# Altium PCB BD1_yd_V1.0.PcbDoc (part 2 of 2)
Units mm, origin at the board's own origin, x right, y up, seen from the top; angles counter-clockwise.
Board outline 135.9 x 133.4 mm, 4 copper layers (Top Layer, Signal Layer 1, Signal Layer 2, Bottom Layer), stack 0.778 mm thick; 102 components, 201 nets, 640 pads, 101 vias.
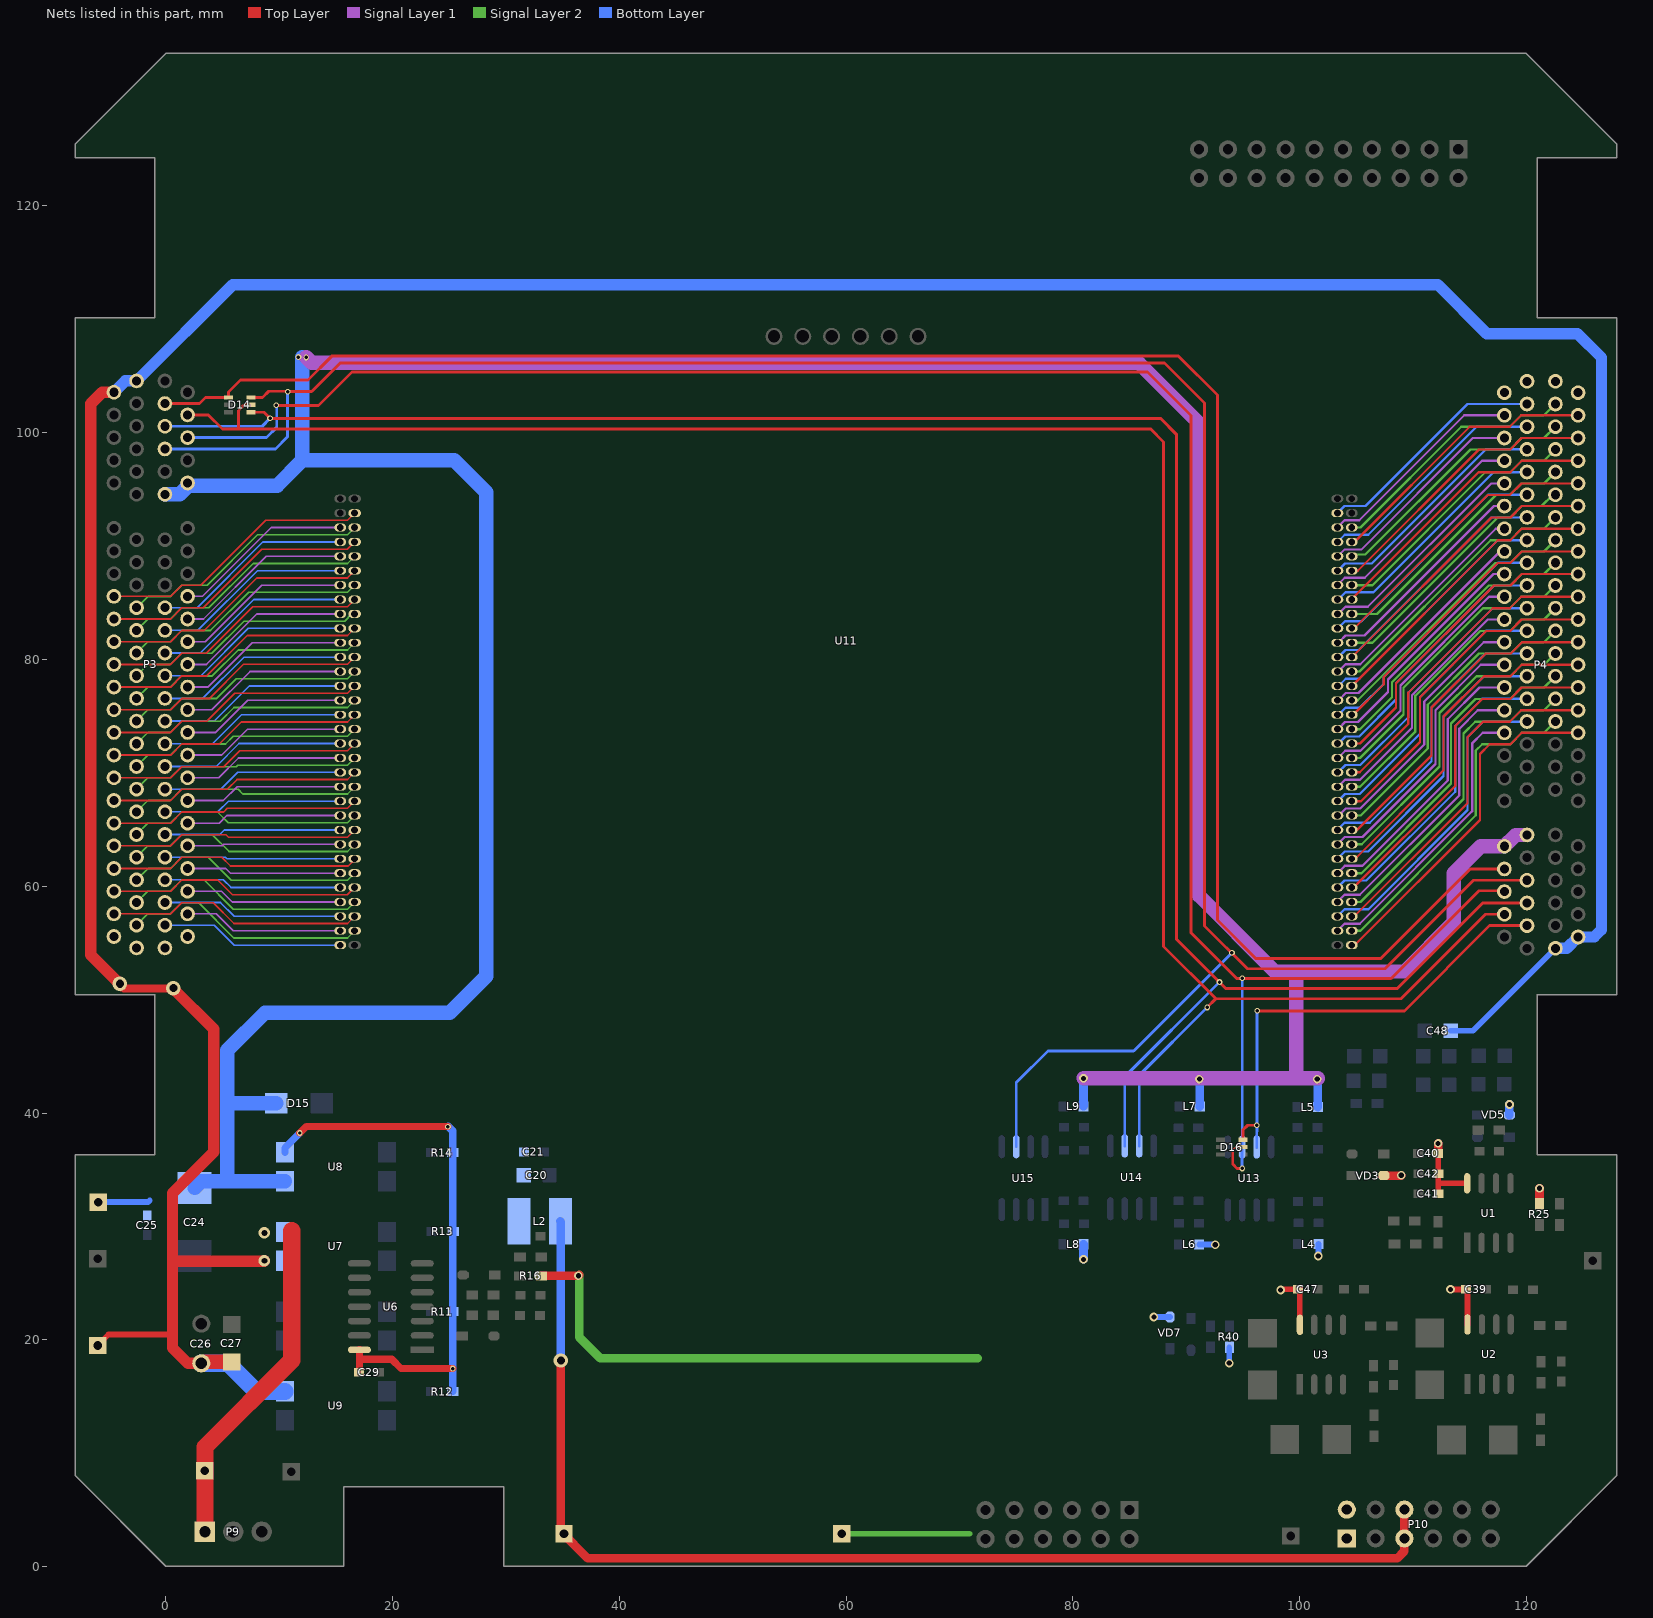
[diagram p4: the nets of this part, all layers, seen from the top]

## Via types
v1: diameter 0.762, hole 0.457, Top Layer to Bottom Layer, 48 vias
v2: diameter 0.508, hole 0.305, Top Layer to Bottom Layer, 40 vias
v3: diameter 1.27, hole 0.711, Top Layer to Bottom Layer, 11 vias
v4: diameter 1.016, hole 0.508, Top Layer to Bottom Layer, 2 vias

## Nets (pads, with @x,y where several pads share a name; then routed paths per layer and width w, separated by ;. In a path a pad name is that pad's centre, name@x,y a point inside that pad or via, vN(x,y) a via of type N, cw(c..) or ccw(c..) an arc to the next point about the centre after c; other vN are vias at no path point) (continued)
V+5V: C20.2 C21.1 C29.1 L2.2 R11.1 R12.1 R13.1 R14.1 U6.14 U8.4 | length 52.2
  Top Layer w0.635: v2(11.836,38.252) 12.421,38.837 24.867,38.837 v2(24.892,38.811) ; C29.1@17.066,17.147 17.091,17.172 17.091,18.29 ; U6.14@17.091,19.128 17.091,18.29 ; v2(25.321,17.477) 20.749,17.477 19.936,18.29 17.091,18.29
  Bottom Layer w0.635: U8.4@10.524,36.547 10.524,36.94 v2(11.836,38.252) ; v2(24.892,38.811) 25.326,38.377 ; v2@24.93,38.849 25.334,38.445 25.326,38.438 25.326,38.377 ; R12.1@25.326,15.445 25.326,38.377 ; R14.1@25.334,36.527 25.334,38.37 25.326,38.377
V_HV1: P9.1 pad.0@3.454,8.458 U7.4 | length 29.7
  Top Layer w1.524: P9.1@3.469,3.099 3.469,10.556 11.125,18.212 11.125,29.642
  other v4: 8.709,29.441
V_HV_C1: C26.1 C27.2 C48.1 P3.A1 P3.A2 P4.A1 P4.A2 pad.0@-5.994,19.507 U7.3 U9.4 | length 328.9
  Top Layer w0.508: pad.0@-5.994,19.507 -5.027,20.474 0.61,20.474
  Top Layer w0.7: v3@-3.886,51.232 -3.658,51.003 v3@0.66,51.003
  Top Layer w1: P3.A2@-4.562,103.575 -5.594,103.575 -6.604,102.565 -6.604,53.95 v3@-3.886,51.232 ; v3@0.66,51.003 4.242,47.422 4.242,36.576 0.61,32.944 0.61,26.949 ; C26.1@3.147,17.937 1.976,17.937 0.61,19.304 0.61,26.949 ; v4(8.709,26.977) 8.682,26.949 0.61,26.949
  Top Layer w1.27: C26.1@3.147,17.937 3.271,18.062 C27.2@5.839,18.062
  Bottom Layer w0.508: C48.1@113.335,47.269 115.291,47.269 P4.A1@122.559,54.537
  Bottom Layer w1: P3.A2@-4.562,103.575 -3.562,104.575 P3.A1@-2.562,104.575 5.914,113.051 112.197,113.051 116.51,108.737 124.511,108.737 126.619,106.629 126.619,56.185 125.971,55.537 P4.A2@124.559,55.537 123.559,54.537 P4.A1@122.559,54.537 P4.A1@122.641,54.455
  Bottom Layer w1.524: C26.1@3.147,17.937 5.506,17.937 7.984,15.459 U9.4@10.524,15.459
  other v3: 0.686,51.029 -4.039,51.41
VCC_3.3V: C39.1 C40.1 C41.1 C42.1 C47.1 L4.1 L6.1 L8.1 P10.1 P10.2 pad.0@59.614,2.921 R16.2 R25.2 R40.1 U1.8 U2.8 U3.8 VD3.2 VD5.2 VD7.2 | length 82.9
  Top Layer w0.508: v1(98.323,24.409) 98.391,24.477 C47.1@99.843,24.477 100.023,24.297 U3.8@100.023,21.334 ; C40.1@112.217,36.449 112.217,32.929 C41.1@112.238,32.908 ; 112.221,33.811 U1.8@114.78,33.811 ; v1(113.309,24.46) C39.1@114.681,24.46 114.808,24.333 U2.8@114.808,21.37
  Top Layer w0.762: R16.2@33.106,25.656 v1(36.4,25.656) v1@36.474,25.73 ; VD3.2@107.421,34.494 108.942,34.494 v1(108.966,34.519) ; C40.1@112.217,36.449 v1(112.217,37.338) ; R25.2@121.158,31.991 v1(121.158,33.376)
  Signal Layer 2 w0.508: pad.0@59.614,2.921 70.891,2.921
  Signal Layer 2 w0.762: v1@36.474,25.73 36.474,20.244 38.329,18.39 71.603,18.39
  Bottom Layer w0.508: v1(87.147,22.022) 87.15,22.025 VD7.2@88.57,22.025 ; L6.1@91.141,28.426 92.529,28.426 v1(92.558,28.397) ; v1@93.777,17.932 v1(93.802,17.958) R40.1@93.802,19.342 ; v1(101.651,27.407) 101.657,27.413 L4.1@101.657,28.451
  Bottom Layer w0.762: L8.1@80.941,28.441 80.941,27.111 v1(80.95,27.102) ; VD5.2@118.489,39.842 118.489,40.74 v1(118.516,40.767)
VCC_5V: L2.1 P10.5 P10.6 pad.0@35.128,2.921 | length 106.7
  Top Layer w0.762: v3(34.849,18.186) 34.849,3.124 37.236,0.737 108.61,0.737 109.24,1.366 P10.5@109.24,2.5 P10.6@109.24,5.04
  Bottom Layer w0.762: L2.1@34.817,30.457 34.849,30.425 v3(34.849,18.186)
VDD_C1: C24.1 C25.1 D15.2 L5.2 L7.2 L9.2 P3.B10 P3.B11 P4.B10 P4.B11 pad.0@-5.944,32.156 U8.3 | length 355
  Signal Layer 1 w1.27: v2(12.4,106.65) 12.882,106.167 85.801,106.167 91.084,100.884 91.084,59.233 97.82,52.497 99.695,52.497 ; v1@101.625,43.053 101.6,43.078 80.95,43.078 80.975,43.104 99.695,43.104 99.695,52.497 ; P4.B11@120.054,64.532 119.054,64.532 P4.B10@118.059,63.537 115.963,63.537 113.589,61.163 113.589,56.836 109.25,52.497 99.695,52.497
  Bottom Layer w0.508: pad.0@-5.944,32.156 -1.549,32.156 -1.397,32.309
  Bottom Layer w0.762: L9.2@80.941,40.604 v1(80.941,43.069) v1@80.975,43.104 ; v1(91.161,43.002) 91.192,42.971 L7.2@91.192,40.593 ; v1(101.549,43.002) 101.606,42.945 L5.2@101.606,40.542
  Bottom Layer w1.27: P3.B11@-0.057,94.58 1.235,94.58 1.997,95.342 9.827,95.342 12.05,97.565 ; C24.1@2.557,33.397 3.167,34.007 5.436,34.007 ; D15.2@9.76,40.869 5.563,40.869 5.436,40.742 ; U8.3@10.524,34.007 5.436,34.007 ; 12.05,106.65 12.05,97.565 ; 5.436,34.007 5.436,40.742 ; 5.436,40.742 5.436,45.542 8.763,48.87 25.07,48.87 28.27,52.07 28.27,94.742 25.447,97.565 12.05,97.565
  other v2: 11.714,106.675
ZL1_DIOB: D14.1 P3.B3 P4.B8 | length 172.5
  Top Layer w0.254: P3.B3@-0.062,102.575 2.982,102.575 3.52,103.114 D14.1@5.538,103.114 5.538,103.593 6.592,104.648 12.548,104.648 14.656,106.756 89.332,106.756 92.761,103.327 92.761,57.023 96.139,53.645 107.163,53.645 115.055,61.537 P4.B8@118.059,61.537
ZL1_HVO1: P3.A18 U11.4 | length 24.3
  Top Layer w0.152: P3.A18@-4.562,85.575 0.442,85.575 1.426,86.56 3.099,86.56 8.819,92.28 16.035,92.28 U11.4@16.67,92.915
ZL1_HVO2: P3.B18 U11.5 | length 16
  Signal Layer 1 w0.152: P3.B18@1.938,85.575 3.257,85.575 9.327,91.645 U11.5@15.4,91.645
ZL1_HVO3: P3.A19 U11.6 | length 22.2
  Signal Layer 2 w0.152: P3.A19@-2.562,84.575 -2.54,84.575 -1.545,85.569 0.436,85.569 1.426,86.56 3.658,86.56 8.108,91.01 16.035,91.01 U11.6@16.67,91.645
ZL1_HVO4: P3.B19 U11.7 | length 17.9
  Bottom Layer w0.152: P3.B19@-0.062,84.575 2.791,84.575 8.591,90.375 U11.7@15.4,90.375
ZL1_HVO5: P3.A20 U11.8 | length 24
  Top Layer w0.152: P3.A20@-4.562,83.575 0.442,83.575 1.426,84.56 3.309,84.56 8.487,89.738 16.033,89.738 U11.8@16.67,90.375
ZL1_HVO6: P3.B20 U11.9 | length 15.8
  Signal Layer 1 w0.152: P3.B20@1.938,83.575 3.34,83.575 8.87,89.105 U11.9@15.4,89.105
ZL1_HVO7: P3.A21 U11.10 | length 21.9
  Signal Layer 2 w0.152: P3.A21@-2.562,82.575 -1.568,83.569 0.414,83.569 1.404,84.56 3.817,84.56 7.727,88.47 16.035,88.47 U11.10@16.67,89.105
ZL1_HVO8: P3.B21 U11.11 | length 17.6
  Bottom Layer w0.152: P3.B21@-0.062,82.575 2.848,82.575 8.108,87.835 U11.11@15.4,87.835
ZL1_HVO9: P3.A22 U11.12 | length 23.8
  Top Layer w0.152: P3.A22@-4.562,81.575 0.442,81.575 1.426,82.56 3.392,82.56 8.03,87.198 16.033,87.198 U11.12@16.67,87.835
ZL1_HVO10: P3.B22 U11.13 | length 15.5
  Signal Layer 1 w0.152: P3.B22@1.938,81.575 3.499,81.575 8.489,86.565 U11.13@15.4,86.565
ZL1_HVO11: P3.A23 U11.14 | length 21.7
  Signal Layer 2 w0.152: P3.A23@-2.562,80.575 -1.568,81.569 0.414,81.569 1.404,82.56 3.951,82.56 7.321,85.93 16.035,85.93 U11.14@16.67,86.565
ZL1_HVO12: P3.B23 U11.15 | length 17.4
  Bottom Layer w0.152: P3.B23@-0.062,80.575 3.058,80.575 7.778,85.295 U11.15@15.4,85.295
ZL1_HVO13: P3.A24 U11.16 | length 23.6
  Top Layer w0.152: P3.A24@-4.562,79.575 0.442,79.575 1.426,80.56 3.576,80.56 7.676,84.66 16.035,84.66 U11.16@16.67,85.295
ZL1_HVO14: P3.B24 U11.17 | length 15.3
  Signal Layer 1 w0.152: P3.B24@1.938,79.575 3.607,79.575 8.057,84.025 U11.17@15.4,84.025
ZL1_HVO15: P3.A25 U11.18 | length 21.5
  Signal Layer 2 w0.152: P3.A25@-2.562,78.575 -1.568,79.569 0.414,79.569 1.404,80.56 4.084,80.56 6.914,83.39 15.794,83.39 16.429,84.025 U11.18@16.67,84.025
ZL1_HVO16: P3.B25 U11.19 | length 17.2
  Bottom Layer w0.152: P3.B25@-0.062,78.575 3.115,78.575 7.295,82.755 U11.19@15.4,82.755
ZL1_HVO17: P3.A26 U11.20 | length 23.4
  Top Layer w0.152: P3.A26@-4.562,77.575 0.442,77.575 1.426,78.56 3.634,78.56 7.194,82.12 16.035,82.12 U11.20@16.67,82.755
ZL1_HVO18: P3.B26 U11.21 | length 15.1
  Signal Layer 1 w0.152: P3.B26@1.938,77.575 3.716,77.575 7.625,81.485 U11.21@15.4,81.485
ZL1_HVO19: P3.A27 U11.22 | length 21.3
  Signal Layer 2 w0.152: P3.A27@-2.562,76.575 -1.568,77.569 0.414,77.569 1.404,78.56 4.116,78.56 6.406,80.85 16.035,80.85 U11.22@16.67,81.485
ZL1_HVO20: P3.B27 U11.23 | length 17
  Bottom Layer w0.152: P3.B27@-0.062,76.575 3.277,76.575 6.917,80.215 U11.23@15.4,80.215
ZL1_HVO21: P3.A28 U11.24 | length 23.2
  Top Layer w0.152: P3.A28@-4.562,75.575 0.442,75.575 1.426,76.56 3.847,76.56 6.867,79.58 16.035,79.58 U11.24@16.67,80.215
ZL1_HVO22: P3.B28 U11.25 | length 14.9
  Signal Layer 1 w0.152: P3.B28@1.938,75.575 4.078,75.575 7.448,78.945 U11.25@15.4,78.945
ZL1_HVO23: P3.A29 U11.26 | length 21
  Signal Layer 2 w0.152: P3.A29@-2.562,74.575 -1.568,75.569 0.414,75.569 1.404,76.56 4.478,76.56 6.228,78.31 16.035,78.31 U11.26@16.67,78.945
ZL1_HVO24: P3.B29 U11.27 | length 16.7
  Bottom Layer w0.152: P3.B29@-0.062,74.575 4.272,74.575 7.371,77.675 U11.27@15.4,77.675
ZL1_HVO25: P3.A30 U11.28 | length 22.9
  Top Layer w0.152: P3.A30@-4.562,73.575 0.442,73.575 1.426,74.56 3.625,74.56 6.105,77.04 16.035,77.04 U11.28@16.67,77.675
ZL1_HVO26: P3.B30 U11.29 | length 14.6
  Signal Layer 1 w0.152: P3.B30@1.938,73.575 4.418,73.575 7.248,76.405 U11.29@15.4,76.405
ZL1_HVO27: P3.A31 U11.30 | length 20.8
  Signal Layer 2 w0.152: P3.A31@-2.562,72.575 -1.568,73.569 0.414,73.569 1.404,74.56 4.815,74.56 6.025,75.77 16.035,75.77 U11.30@16.67,76.405
ZL1_HVO28: P3.B31 U11.31 | length 16.5
  Bottom Layer w0.152: P3.B31@-0.062,72.575 4.129,72.575 6.689,75.135 U11.31@15.4,75.135
ZL1_HVO29: P3.A32 U11.32 | length 22.7
  Top Layer w0.152: P3.A32@-4.562,71.575 0.442,71.575 1.426,72.56 4.72,72.56 6.66,74.5 16.035,74.5 U11.32@16.67,75.135
ZL1_HVO30: P3.B32 U11.33 | length 14.4
  Signal Layer 1 w0.152: P3.B32@1.938,71.575 4.933,71.575 7.223,73.865 U11.33@15.4,73.865
ZL1_HVO31: P3.A33 U11.34 | length 20.6
  Signal Layer 2 w0.152: P3.A33@-2.562,70.575 -1.568,71.569 0.414,71.569 1.404,72.56 5.279,72.56 5.949,73.23 16.035,73.23 U11.34@16.67,73.865
ZL1_HVO32: P3.B33 U11.35 | length 16.3
  Bottom Layer w0.152: P3.B33@-0.062,70.575 4.456,70.575 6.476,72.595 U11.35@15.4,72.595
ZL1_HVO33: P3.A34 U11.36 | length 22.5
  Top Layer w0.152: P3.A34@-4.562,69.575 0.442,69.575 1.426,70.56 5.137,70.56 6.537,71.96 16.035,71.96 U11.36@16.67,72.595
ZL1_HVO34: P3.B34 U11.37 | length 14.2
  Signal Layer 1 w0.152: P3.B34@1.938,69.575 4.682,69.575 6.432,71.325 U11.37@15.4,71.325
ZL1_HVO35: P3.A35 U11.38 | length 20.4
  Signal Layer 2 w0.152: P3.A35@-2.562,68.575 -1.568,69.569 0.414,69.569 1.404,70.56 6.225,70.56 6.355,70.69 16.035,70.69 U11.38@16.67,71.325
ZL1_HVO36: P3.B35 U11.39 | length 16.1
  Bottom Layer w0.152: P3.B35@-0.062,68.575 4.876,68.575 6.355,70.055 U11.39@15.4,70.055
ZL1_HVO37: P3.A36 U11.40 | length 22.3
  Top Layer w0.152: P3.A36@-4.562,67.575 0.442,67.575 1.426,68.56 5.445,68.56 6.305,69.42 16.035,69.42 U11.40@16.67,70.055
ZL1_HVO38: P3.B36 U11.41 | length 14
  Signal Layer 1 w0.152: P3.B36@1.938,67.575 5.095,67.575 6.305,68.785 U11.41@15.4,68.785
ZL1_HVO39: P3.A37 U11.42 | length 20.5
  Signal Layer 2 w0.152: P3.A37@-2.562,66.575 -1.568,67.569 0.414,67.569 1.404,68.56 6.399,68.56 6.809,68.15 16.035,68.15 U11.42@16.67,68.785
ZL1_HVO40: P3.B37 U11.43 | length 15.9
  Bottom Layer w0.152: P3.B37@-0.062,66.575 4.603,66.575 5.543,67.515 U11.43@15.4,67.515
ZL1_HVO41: P3.A38 U11.44 | length 22
  Top Layer w0.152: P3.A38@-4.562,65.575 0.442,65.575 1.426,66.56 5.115,66.56 5.435,66.88 16.035,66.88 U11.44@16.67,67.515
ZL1_HVO42: P3.B38 U11.45 | length 13.7
  Signal Layer 1 w0.152: P3.B38@1.938,65.575 4.72,65.575 5.39,66.245 U11.45@15.4,66.245
ZL1_HVO43: P3.A39 U11.46 | length 20.7
  Signal Layer 2 w0.152: P3.A39@-2.562,64.575 -1.568,65.569 0.414,65.569 1.404,66.56 4.57,66.56 5.52,65.61 16.035,65.61 U11.46@16.67,66.245
ZL1_HVO44: P3.B39 U11.47 | length 15.6
  Bottom Layer w0.152: P3.B39@-0.062,64.575 4.781,64.575 5.181,64.975 U11.47@15.4,64.975
ZL1_HVO45: P3.A40 U11.48 | length 22
  Top Layer w0.152: P3.A40@-4.562,63.575 0.442,63.575 1.426,64.56 5.325,64.56 5.545,64.34 16.035,64.34 U11.48@16.67,64.975
ZL1_HVO46: P3.B40 U11.49 | length 13.5
  Signal Layer 1 w0.152: P3.B40@1.938,63.575 5.001,63.575 5.13,63.705 U11.49@15.4,63.705
ZL1_HVO47: P3.A41 U11.50 | length 20.9
  Signal Layer 2 w0.152: P3.A41@-2.562,62.575 -1.568,63.569 0.414,63.569 1.404,64.56 4.106,64.56 5.596,63.07 16.035,63.07 U11.50@16.67,63.705
ZL1_HVO48: P3.B41 U11.51 | length 15.5
  Bottom Layer w0.152: P3.B41@-0.062,62.575 5.271,62.575 5.411,62.435 U11.51@15.4,62.435
ZL1_HVO49: P3.A42 U11.52 | length 22.3
  Top Layer w0.152: P3.A42@-4.562,61.575 0.442,61.575 1.426,62.56 4.963,62.56 5.723,61.8 16.106,61.8 16.67,62.364 U11.52@16.67,62.435
ZL1_HVO50: P3.B42 U11.53 | length 13.6
  Signal Layer 1 w0.152: P3.B42@1.938,61.575 5.313,61.575 5.723,61.165 U11.53@15.4,61.165
ZL1_HVO51: P3.A43 U11.54 | length 21.2
  Signal Layer 2 w0.152: P3.A43@-2.562,60.575 -1.568,61.569 0.414,61.569 1.404,62.56 3.744,62.56 5.774,60.53 16.035,60.53 U11.54@16.67,61.165
ZL1_HVO52: P3.B43 U11.55 | length 15.7
  Bottom Layer w0.152: P3.B43@-0.062,60.575 5.094,60.575 5.774,59.895 U11.55@15.4,59.895
ZL1_HVO53: P3.A44 U11.56 | length 22.4
  Top Layer w0.152: P3.A44@-4.562,59.575 0.442,59.575 1.426,60.56 4.601,60.56 5.901,59.26 16.005,59.26 16.64,59.895 U11.56@16.67,59.895
ZL1_HVO54: P3.B44 U11.57 | length 13.9
  Signal Layer 1 w0.152: P3.B44@1.938,59.575 4.926,59.575 5.876,58.625 U11.57@15.4,58.625
ZL1_HVO55: P3.A45 U11.58 | length 21.4
  Signal Layer 2 w0.152: P3.A45@-2.562,58.575 -1.568,59.569 0.414,59.569 1.404,60.56 3.407,60.56 5.977,57.99 16.035,57.99 U11.58@16.67,58.625
ZL1_HVO56: P3.B45 U11.59 | length 16
  Bottom Layer w0.152: P3.B45@-0.062,58.575 4.834,58.575 6.054,57.355 U11.59@15.4,57.355
ZL1_HVO57: P3.A46 U11.60 | length 22.7
  Top Layer w0.152: P3.A46@-4.562,57.575 0.442,57.575 1.426,58.56 4.188,58.56 6.028,56.72 16.035,56.72 U11.60@16.67,57.355
ZL1_HVO58: P3.B46 U11.61 | length 14.1
  Signal Layer 1 w0.152: P3.B46@1.938,57.575 4.481,57.575 5.971,56.085 U11.61@15.4,56.085
ZL1_HVO59: P3.A47 U11.62 | length 21.6
  Signal Layer 2 w0.152: P3.A47@-2.562,56.575 -1.568,57.569 0.414,57.569 1.404,58.56 2.911,58.56 6.021,55.45 16.035,55.45 U11.62@16.67,56.085
ZL1_HVO60: P3.B47 U11.63 | length 16.2
  Bottom Layer w0.152: P3.B47@-0.062,56.575 4.277,56.575 6.037,54.815 U11.63@15.4,54.815
ZL1_HVO61: P3.A48
ZL1_HVO62: P3.B48
ZL1_HVO63: P3.A49
ZL1_HVO64: P3.B49
ZL1_ZL2_BL: D14.5 P3.B4 P4.B4 U14.7 | length 185.3
  Top Layer w0.254: P3.B4@1.938,101.575 3.759,101.575 5.009,100.325 6.426,100.325 ; D14.5@7.518,102.464 6.934,102.464 6.426,101.956 6.426,100.325 ; v2(91.846,49.327) 92.608,50.089 92.619,50.089 ; P4.B4@118.059,57.537 116.389,57.537 108.941,50.089 92.619,50.089 ; 6.426,100.325 86.877,100.325 88.011,99.192 88.011,54.697 92.619,50.089
  Bottom Layer w0.254: U14.7@85.855,37.115 85.855,43.336 v2(91.846,49.327)
ZL1_ZL2_CLK: D16.5 P3.B6 P4.B6 U13.6 | length 192.4
  Top Layer w0.254: v2(9.749,102.418) 13.493,102.418 16.429,105.354 86.593,105.354 90.424,101.523 90.424,55.905 94.463,51.867 108.077,51.867 115.824,59.614 117.982,59.614 P4.B6@118.059,59.537 ; v2(94.945,35.128) 94.488,35.128 94.107,35.509 94.107,36.652 94.463,37.008 D16.5@94.995,37.008
  Bottom Layer w0.254: P3.B6@1.938,99.575 8.887,99.575 9.8,100.488 9.8,102.368 v2(9.749,102.418) ; v2(94.945,35.128) 94.92,35.154 94.92,37.017 U13.6@94.949,36.988 ; U13.6@94.945,36.458 v2(94.945,51.892)
ZL1_ZL2_DIOA: D16.6 P4.B3 U13.7 | length 41.8
  Top Layer w0.254: D16.6@94.995,37.658 94.995,38.506 95.428,38.938 v2(96.219,38.938) ; v2(96.266,49.022) 109.245,49.022 116.76,56.537 P4.B3@120.059,56.537
  Bottom Layer w0.254: U13.7@96.219,36.988 v2(96.219,38.938) ; 96.244,38.379 96.244,49 v2(96.266,49.022)
ZL1_ZL2_LE: D14.6 P3.B7 P4.B7 U15.6 | length 210.9
  Top Layer w0.254: D14.6@7.518,103.114 8.549,103.114 9.093,103.657 10.742,103.657 v2(10.772,103.627) 12.88,103.627 15.394,106.142 88.092,106.142 91.618,102.616 91.618,56.515 95.402,52.73 107.518,52.73 115.325,60.537 P4.B7@120.059,60.537
  Bottom Layer w0.254: P3.B7@-0.062,98.575 9.682,98.575 10.765,99.658 v2@10.765,103.627 ; U15.6@75.01,37.039 75.01,42.701 77.8,45.491 85.369,45.491 v2(94.031,54.153)
ZL1_ZL2_POL: D14.4 P3.B5 P4.B5 U14.6 | length 190.3
  Top Layer w0.254: D14.4@7.518,101.814 8.677,101.814 v2(9.216,101.275) 87.731,101.275 89.129,99.877 89.129,55.372 93.523,50.978 108.585,50.978 116.144,58.537 P4.B5@120.059,58.537
  Bottom Layer w0.254: P3.B5@-0.062,100.575 8.515,100.575 v2(9.216,101.275) ; U14.6@84.585,37.115 84.585,43.209 v2(92.939,51.562)
ZL2_HVO1: P4.A18 U11.127 | length 31.1
  Top Layer w0.2: U11.127@104.6,54.815 104.853,54.815 115.9,65.862 115.9,71.679 116.764,72.542 118.593,72.542 119.587,73.537 P4.A18@124.559,73.537
ZL2_HVO2: P4.B18 U11.126 | length 25.5
  Signal Layer 1 w0.2: U11.126@103.33,56.085 103.958,56.713 105.304,56.713 115.214,66.623 115.214,72.593 116.158,73.537 P4.B18@118.059,73.537
ZL2_HVO3: P4.A19 U11.125 | length 29
  Signal Layer 2 w0.2: U11.125@104.6,56.085 105.362,56.085 115.545,66.267 115.545,71.984 116.103,72.542 118.593,72.542 119.587,73.537 121.559,73.537 P4.A19@122.559,74.537
ZL2_HVO4: P4.B19 U11.124 | length 27.6
  Bottom Layer w0.2: U11.124@103.33,57.355 103.958,57.983 106.066,57.983 114.808,66.725 114.808,73.152 116.18,74.524 120.045,74.524 P4.B19@120.059,74.537
ZL2_HVO5: P4.A20 U11.123 | length 30.9
  Top Layer w0.2: U11.123@104.6,57.355 104.829,57.355 114.808,67.334 114.808,73.152 116.18,74.524 118.542,74.524 119.555,75.537 P4.A20@124.559,75.537
ZL2_HVO6: P4.B20 U11.122 | length 25.2
  Signal Layer 1 w0.2: U11.122@103.33,58.625 103.958,59.253 105.304,59.253 114.071,68.02 114.071,73.889 115.72,75.537 P4.B20@118.059,75.537
ZL2_HVO7: P4.A21 U11.121 | length 28.8
  Signal Layer 2 w0.2: U11.121@104.6,58.625 105.362,58.625 114.452,67.715 114.452,73.482 115.494,74.524 118.542,74.524 119.555,75.537 121.559,75.537 P4.A21@122.559,76.537
ZL2_HVO8: P4.B21 U11.120 | length 27
  Bottom Layer w0.2: U11.120@103.33,59.895 103.958,60.523 105.888,60.523 113.716,68.35 113.716,74.143 116.11,76.537 P4.B21@120.059,76.537
ZL2_HVO9: P4.A22 U11.119 | length 30.4
  Top Layer w0.2: U11.119@104.6,59.895 104.752,59.895 113.716,68.858 113.716,74.143 116.103,76.53 118.567,76.53 119.574,77.537 P4.A22@124.559,77.537
ZL2_HVO10: P4.B22 U11.118 | length 24.7
  Signal Layer 1 w0.2: U11.118@103.33,61.165 103.972,61.807 105.522,61.807 113.055,69.341 113.055,74.727 115.866,77.537 P4.B22@118.059,77.537
ZL2_HVO11: P4.A23 U11.117 | length 28.3
  Signal Layer 2 w0.2: U11.117@104.6,61.165 105.464,61.165 113.36,69.061 113.36,74.371 115.519,76.53 118.567,76.53 119.574,77.537 121.559,77.537 P4.A23@122.559,78.537
ZL2_HVO12: P4.B23 U11.116 | length 26.5
  Bottom Layer w0.2: U11.116@103.33,62.435 103.972,63.077 106.055,63.077 112.7,69.722 112.7,74.981 116.256,78.537 P4.B23@120.059,78.537
ZL2_HVO13: P4.A24 U11.115 | length 29.8
  Top Layer w0.2: U11.115@104.6,62.435 104.905,62.435 112.7,70.23 112.7,74.981 116.256,78.537 118.593,78.537 119.593,79.537 P4.A24@124.559,79.537
ZL2_HVO14: P4.B24 U11.114 | length 24.1
  Signal Layer 1 w0.2: U11.114@103.33,63.705 103.972,64.347 105.547,64.347 111.989,70.789 111.989,75.54 115.986,79.537 P4.B24@118.059,79.537
ZL2_HVO15: P4.A25 U11.113 | length 27.7
  Signal Layer 2 w0.2: U11.113@104.6,63.705 105.489,63.705 112.344,70.56 112.344,75.286 115.595,78.537 118.593,78.537 119.593,79.537 121.559,79.537 P4.A25@122.559,80.537
ZL2_HVO16: P4.B25 U11.112 | length 25.9
  Bottom Layer w0.2: U11.112@103.33,64.975 103.958,65.603 106.193,65.603 111.633,71.043 111.633,75.768 116.402,80.537 P4.B25@120.059,80.537
ZL2_HVO17: P4.A26 U11.111 | length 29.3
  Top Layer w0.2: U11.111@104.6,64.975 105.057,64.975 111.633,71.551 111.633,75.768 116.408,80.543 118.618,80.543 119.612,81.537 P4.A26@124.559,81.537
ZL2_HVO18: P4.B26 U11.110 | length 23.3
  Signal Layer 1 w0.2: U11.110@103.537,66.245 103.537,66.346 104.064,66.873 105.354,66.873 110.998,72.517 110.998,76.302 116.233,81.537 P4.B26@118.059,81.537
  Bottom Layer w0.2: U11.110@103.33,66.245 U11.110@103.537,66.245
ZL2_HVO19: P4.A27 U11.109 | length 27
  Signal Layer 2 w0.2: U11.109@104.6,66.245 105.386,66.245 111.303,72.161 111.303,76.022 115.824,80.543 118.618,80.543 119.612,81.537 121.559,81.537 P4.A27@122.559,82.537
ZL2_HVO20: P4.B27 U11.108 | length 24.8
  Bottom Layer w0.2: U11.108@103.33,67.515 103.386,67.515 104.013,68.143 105.303,68.143 110.617,73.457 110.617,76.683 116.471,82.537 P4.B27@120.059,82.537
ZL2_HVO21: P4.A28 U11.107 | length 28.9
  Top Layer w0.2: U11.107@104.6,67.515 105.412,67.515 110.617,72.72 110.617,76.683 116.459,82.525 118.567,82.525 119.58,83.537 P4.A28@124.559,83.537
ZL2_HVO22: P4.B28 U11.106 | length 22.6
  Signal Layer 1 w0.2: U11.106@103.537,68.785 103.537,68.936 104.013,69.413 105.328,69.413 109.906,73.99 109.906,76.86 116.582,83.537 P4.B28@118.059,83.537
  Bottom Layer w0.2: U11.106@103.33,68.785 U11.106@103.537,68.785
ZL2_HVO23: P4.A29 U11.105 | length 26.3
  Signal Layer 2 w0.2: U11.105@104.6,68.785 105.336,68.785 110.211,73.66 110.211,76.81 115.926,82.525 118.567,82.525 119.58,83.537 121.559,83.537 P4.A29@122.559,84.537
ZL2_HVO24: P4.B29 U11.104 | length 24
  Bottom Layer w0.2: U11.104@103.33,70.055 103.411,70.055 104.053,70.697 105.353,70.697 109.576,74.92 109.576,77.064 117.043,84.531 120.053,84.531 P4.B29@120.059,84.537
ZL2_HVO25: P4.A30 U11.103 | length 28
  Top Layer w0.2: U11.103@104.6,70.055 105.31,70.055 109.576,74.32 109.576,77.064 117.043,84.531 118.542,84.531 119.548,85.537 P4.A30@124.559,85.537
ZL2_HVO26: P4.B30 U11.102 | length 22
  Signal Layer 1 w0.2: U11.102@103.537,71.325 103.537,71.476 104.028,71.967 105.368,71.967 108.89,75.489 108.89,77.724 116.703,85.537 P4.B30@118.059,85.537
  Bottom Layer w0.2: U11.102@103.33,71.325 U11.102@103.537,71.325
ZL2_HVO27: P4.A31 U11.101 | length 25.1
  Signal Layer 2 w0.2: 105.181,71.325 105.336,71.325 109.169,75.159 109.169,77.521 116.18,84.531 118.542,84.531 119.548,85.537 121.559,85.537 P4.A31@122.559,86.537
ZL2_HVO28: P4.B31 U11.100 | length 23.3
  Bottom Layer w0.2: U11.100@103.33,72.595 103.411,72.595 104.039,73.223 105.252,73.223 108.509,76.479 108.509,77.902 117.144,86.537 P4.B31@120.059,86.537
ZL2_HVO29: P4.A32 U11.99 | length 27.4
  Top Layer w0.2: U11.99@104.6,72.595 105.336,72.595 108.509,75.768 108.509,77.902 117.145,86.538 118.593,86.538 119.592,87.537 P4.A32@124.559,87.537
ZL2_HVO30: P4.B32 U11.98 | length 21.1
  Signal Layer 1 w0.2: U11.98@103.537,73.865 103.537,74.016 104.013,74.493 105.151,74.493 107.798,77.14 107.798,78.232 117.103,87.537 P4.B32@118.059,87.537
  Bottom Layer w0.2: U11.98@103.33,73.865 U11.98@103.537,73.865
ZL2_HVO31: P4.A33 U11.97 | length 24.8
  Signal Layer 2 w0.2: U11.97@104.6,73.865 105.336,73.865 108.153,76.683 108.153,78.003 116.688,86.538 118.593,86.538 119.592,87.537 121.559,87.537 P4.A33@122.559,88.537
ZL2_HVO32: P4.B33 U11.96 | length 22.6
  Bottom Layer w0.2: U11.96@103.33,75.135 103.436,75.135 104.064,75.763 105.328,75.763 107.417,77.851 107.417,78.461 117.493,88.537 P4.B33@120.059,88.537
ZL2_HVO33: P4.A34 U11.95 | length 26.3
  Top Layer w0.2: U11.95@104.6,75.135 104.663,75.072 107.417,77.825 107.417,78.461 117.475,88.519 118.567,88.519 119.585,89.537 P4.A34@124.559,89.537
ZL2_HVO34: P4.B34 U11.94 | length 20.2
  Signal Layer 1 w0.2: U11.94@103.537,76.405 103.537,76.506 104.079,77.047 105.19,77.047 117.68,89.537 P4.B34@118.059,89.537
  Bottom Layer w0.2: U11.94@103.33,76.405 U11.94@103.537,76.405
ZL2_HVO35: P4.A35 U11.93 | length 23.8
  Signal Layer 2 w0.2: U11.93@104.6,76.405 105.132,76.405 117.246,88.519 118.567,88.519 119.585,89.537 121.559,89.537 P4.A35@122.559,90.537
ZL2_HVO36: P4.B35 U11.92 | length 22.1
  Bottom Layer w0.2: U11.92@103.33,77.675 103.436,77.675 104.064,78.303 105.252,78.303 117.475,90.526 120.047,90.526 P4.B35@120.059,90.537
ZL2_HVO37: P4.A36 U11.91 | length 25.7
  Top Layer w0.2: U11.91@104.6,77.675 104.624,77.675 117.475,90.526 118.567,90.526 119.579,91.537 P4.A36@124.559,91.537
ZL2_HVO38: P4.B36 U11.90 | length 20
  Signal Layer 1 w0.2: U11.90@103.537,78.945 103.537,79.071 104.053,79.587 105.343,79.587 117.293,91.537 P4.B36@118.059,91.537
  Bottom Layer w0.2: U11.90@103.33,78.945 U11.90@103.537,78.945
ZL2_HVO39: P4.A37 U11.89 | length 23.6
  Signal Layer 2 w0.2: U11.89@104.6,78.945 105.285,78.945 116.865,90.526 118.567,90.526 119.579,91.537 121.559,91.537 P4.A37@122.559,92.537
ZL2_HVO40: P4.B37 U11.88 | length 21.8
  Bottom Layer w0.2: U11.88@103.33,80.215 103.411,80.215 104.039,80.843 105.228,80.843 116.922,92.537 P4.B37@120.059,92.537
ZL2_HVO41: P4.A38 U11.87 | length 25.5
  Top Layer w0.2: U11.87@104.6,80.215 116.917,92.532 118.593,92.532 119.597,93.537 P4.A38@124.559,93.537
ZL2_HVO42: P4.B38 U11.86 | length 19.8
  Signal Layer 1 w0.2: U11.86@103.537,81.485 103.537,81.611 104.053,82.127 105.724,82.127 117.134,93.537 P4.B38@118.059,93.537
  Bottom Layer w0.2: U11.86@103.33,81.485 U11.86@103.537,81.485
ZL2_HVO43: P4.A39 U11.85 | length 23.4
  Signal Layer 2 w0.2: U11.85@104.6,81.485 106.429,81.485 117.476,92.532 118.593,92.532 119.597,93.537 121.336,93.537 122.336,94.537 P4.A39@122.559,94.537
ZL2_HVO44: P4.B39 U11.84 | length 21.6
  Bottom Layer w0.2: U11.84@103.33,82.755 103.386,82.755 104.013,83.383 105.455,83.383 116.61,94.537 P4.B39@120.059,94.537
ZL2_HVO45: P4.A40 U11.83 | length 25.3
  Top Layer w0.2: U11.83@104.6,82.755 104.828,82.755 116.586,94.513 118.542,94.513 119.565,95.537 P4.A40@124.559,95.537
ZL2_HVO46: P4.B40 U11.82 | length 19.6
  Signal Layer 1 w0.2: U11.82@103.537,84.025 103.537,84.151 104.039,84.653 106.014,84.653 116.898,95.537 P4.B40@118.059,95.537
  Bottom Layer w0.2: U11.82@103.33,84.025 U11.82@103.537,84.025
ZL2_HVO47: P4.A41 U11.81 | length 23.1
  Signal Layer 2 w0.2: U11.81@104.6,84.025 106.834,84.025 117.323,94.513 118.542,94.513 119.565,95.537 121.557,95.537 P4.A41@122.559,96.537 P4.A41@122.559,96.537
ZL2_HVO48: P4.B41 U11.80 | length 21.4
  Bottom Layer w0.2: U11.80@103.33,85.295 103.411,85.295 104.053,85.937 106.511,85.937 117.094,96.52 120.042,96.52 P4.B41@120.059,96.537
ZL2_HVO49: P4.A42 U11.79 | length 25.1
  Top Layer w0.2: U11.79@104.6,85.295 104.6,85.347 115.773,96.52 118.567,96.52 119.584,97.537 P4.A42@124.559,97.537
ZL2_HVO50: P4.B42 U11.78 | length 19.3
  Signal Layer 1 w0.2: U11.78@103.33,86.565 103.972,87.207 105.749,87.207 116.079,97.537 P4.B42@118.059,97.537
ZL2_HVO51: P4.A43 U11.77 | length 22.9
  Signal Layer 2 w0.2: U11.77@104.6,86.565 106.428,86.565 116.383,96.52 118.567,96.52 119.584,97.537 121.559,97.537 P4.A43@122.559,98.537
ZL2_HVO52: P4.B43 U11.76 | length 21.2
  Bottom Layer w0.2: U11.76@103.33,87.835 103.386,87.835 104.013,88.463 106.37,88.463 116.444,98.537 P4.B43@120.059,98.537
ZL2_HVO53: P4.A44 U11.75 | length 24.8
  Top Layer w0.2: U11.75@104.6,87.835 105.132,87.835 115.824,98.527 118.567,98.527 119.578,99.537 P4.A44@124.559,99.537
ZL2_HVO54: P4.B44 U11.74 | length 19.2
  Signal Layer 1 w0.178: U11.74@103.553,89.105 103.553,89.298 103.977,89.722 105.47,89.722 115.285,99.537 P4.B44@118.059,99.537
  Bottom Layer w0.178: U11.74@103.33,89.105 U11.74@103.553,89.105
ZL2_HVO55: P4.A45 U11.73 | length 22.7
  Signal Layer 2 w0.2: U11.73@104.6,89.105 104.752,89.257 105.793,89.257 115.062,98.527 118.567,98.527 119.578,99.537 121.559,99.537 P4.A45@122.559,100.537
ZL2_HVO56: P4.B45 U11.72 | length 20.9
  Bottom Layer w0.2: U11.72@103.33,90.375 103.36,90.375 103.988,91.003 106.065,91.003 115.599,100.537 P4.B45@120.059,100.537
ZL2_HVO57: P4.A46 U11.71 | length 24.6
  Top Layer w0.2: U11.71@104.6,90.375 104.853,90.375 115.011,100.533 118.542,100.533 119.546,101.537 P4.A46@124.559,101.537
ZL2_HVO58: P4.B46 U11.70 | length 18.8
  Signal Layer 1 w0.2: U11.70@103.33,91.645 103.964,92.279 105.258,92.279 114.516,101.537 P4.B46@118.059,101.537
ZL2_HVO59: P4.A47 U11.69 | length 22.5
  Signal Layer 2 w0.2: U11.69@104.6,91.645 105.361,91.645 114.249,100.533 118.542,100.533 119.546,101.537 121.559,101.537 P4.A47@122.559,102.537
ZL2_HVO60: P4.B47 U11.68 | length 20.7
  Bottom Layer w0.2: U11.68@103.33,92.915 103.335,92.915 103.963,93.543 105.811,93.543 114.805,102.537 P4.B47@120.059,102.537
ZL2_HVO61: P4.A48
ZL2_HVO62: P4.B48
ZL2_HVO63: P4.A49
ZL2_HVO64: P4.B49
pads on no net: D14.3 D16.1 D16.3 D16.4 P3.A3 P3.A4 P3.A5 P3.A6 P3.A7 P3.A8 P3.A9 P3.A10 P3.A11 P3.A12 P3.A13 P3.A14 P3.A15 P3.A16 P3.A17 P3.B8 P3.B9 P3.B12 P3.B13 P3.B14 P3.B15 P3.B16 P3.B17 P4.A3 P4.A4 P4.A5 P4.A6 P4.A7 P4.A8 P4.A9 P4.A10 P4.A11 P4.A12 P4.A13 P4.A14 P4.A15 P4.A16 P4.A17 P4.B9 P4.B12 P4.B13 P4.B14 P4.B15 P4.B16 P4.B17 P9.2 P10.11 P10.12 P21.2 P21.9 P21.11 P30.1 P30.2 U15.2 U15.7

## Polygon pours and split planes (outlines as drawn)
GND on Signal Layer 1 "Top Layer-No Net" (solid, remove dead copper, pour order 13): 7.188,1.295 7.188,9.906 9.296,12.014 13.335,16.053 13.335,20.066 13.335,22.682 14.326,23.673 15.392,24.74 15.392,36.932 17.297,38.837 17.323,38.837 40.157,38.837 41.859,37.135 41.885,37.109 41.885,24.997 41.885,24.333 44.552,21.666 44.577,21.641 71.806,21.641 71.821,21.641 72.288,22.109 72.288,32.754 72.288,33.02 72.796,33.528 103.353,33.528 103.861,34.036 103.861,44.043 103.861,44.044 106.07,46.253 106.096,46.228 119.507,46.228 119.572,46.228 120.04,45.759 120.04,35.408 120.65,34.798 120.675,34.773 124.993,34.773 125.096,34.773 125.578,34.291 125.578,8.077 118.73,1.23
GND_C1 on Signal Layer 1 "Top Layer-No Net" (solid, remove dead copper, pour order 5): 73.127,34.747 73.177,34.696 103.048,34.696 103.048,44.094 103.149,44.196 102.895,43.942 73.127,43.942
VCC_3.3V on Signal Layer 2 "Top Layer-No Net" (solid, remove dead copper, pour order 9): 118.73,1.23 125.578,8.077 125.578,34.752 120.061,34.752 120.04,34.773 120.04,46.253 106.07,46.253 103.861,44.044 103.861,34.036 103.353,33.528 72.314,33.528 72.288,33.503 72.288,21.641 72.288,21.59 70.942,20.244 69.621,18.923 69.621,1.245

## Keep-outs
Keep-Out Layer:
  circle w0.1: c23.5,62 r1.65
  circle w0.1: c23.5,87 r1.65
  circle w0.1: c60,103.295 r1.35
  circle w0.1: c96.5,62 r1.65
  circle w0.1: c96.5,87 r1.65
  circle w0.1: c23.5,61.988 r1.65
  circle w0.1: c23.5,87.007 r1.65
  circle w0.1: c60,103.289 r1.35
  circle w0.1: c96.5,61.988 r1.65
  circle w0.1: c96.5,87.007 r1.65
  lines w0.1: -8,53.395 -8,107.195 ; -8,77.147 -8,50.4 -1,50.4 -1,36.4 -8,36.4 -8,8 ; -8,81.947 -8,110.2 -1,110.2 -1,124.2 -8,124.2 -8,125.5 ; 15.494,0 15.316,0 15.316,7.493 30.15,7.493 30.15,0 ; 128,53.395 128,107.195 ; 128,77.147 128,50.4 121,50.4 121,36.4 128,36.4 128,8 ; 128,81.947 128,110.2 121,110.2 121,124.2 128,124.2 128,125.5 ; -8,8 0,0 ; -8,8 0,0 ; -8,125.5 0,133.5 ; -8,125.5 0,133.5 ; 0,0 15.773,0 15.773,7 29.773,7 29.773,0 120,0 ; 0,133.5 120,133.5 ; 0,133.5 120,133.5 ; 35,49.495 49,49.495 ; 35,49.495 35,99.495 ; 35,49.495 49,49.495 ; 35,49.495 35,99.495 ; 35,99.495 85,99.495 ; 35,99.495 85,99.495 ; 49,22.895 49,49.495 ; 49,22.895 71,22.895 ; 49,22.895 49,49.495 ; 49,22.895 71,22.895 ; 71,22.895 71,49.495 ; 71,22.895 71,49.495 ; 71,49.495 85,49.495 ; 71,49.495 85,49.495 ; 85,49.495 85,99.495 ; 85,49.495 85,99.495 ; 120,0 128,8 ; 120,0 128,8 ; 120,133.5 128,125.5 ; 120,133.5 128,125.5

## Other copper
Top Layer:
  rectangle net V_HV1: 8.151,28.679 11.405,30.406
  rectangle net VCC_3.3V: 103.124,1.523 105.163,6.147
  rectangle net GND: 105.689,1.524 107.569,6.096
  rectangle net GND: 110.846,1.448 115.24,6.147
Signal Layer 1:
  rectangle net VDD_C1: 11.333,106.116 12.4,107.285
Signal Layer 2:
  rectangle net V_HV_C1: -4.013,50.724 0.711,51.359
Bottom Layer:
  rectangle net V_HV_C1: -4.013,50.698 0.711,51.359
  rectangle net VDD_C1: 11.333,106.294 12.781,107.285
  rectangle net VDD_C1: 4.403,37.674 6.918,39.503
  rectangle net V_HV_C1: 8.125,26.24 11.275,27.587
  rectangle net GND_C1: -2.009,26.444 2.664,28.755
  rectangle net GND_C1: -2.009,26.444 -0.816,29.669
  rectangle net VDD_C1: -2.06,32.616 2.766,34.622
  rectangle net VDD_C1: -2.06,30.533 -0.866,34.622
  rectangle net GND_C1: 2.08,20.602 4.391,28.755
  rectangle net V_HV1: 8.151,28.679 11.275,30.355
  rectangle net V+5V: 30.376,30.66 32.052,37.112
  rectangle net V+5V: 25.067,33.352 31.112,35.638
  rectangle net VCC_3.3V: 103.124,1.523 105.163,6.147
  rectangle net GND: 105.689,1.524 107.569,6.096
  rectangle net GND: 110.846,1.448 115.24,6.147

## Silkscreen, mask and mechanical layers (free items; w line width, h text height)
Top Overlay:
  drawing of 1105 lines, arcs and shapes, not listed
  text "DROP CONTROL BDNO1 V1.0" at 36.322,129.692 h1.8
  text "VDD_C1" at -4.445,31.318 h1.8
  text "S1" at 124.917,28.219 h1.5
  text "GND_C1" at -4.496,26.391 h1.8
  text "V_HV_C1" at -7.493,20.955 h1.5
  text "HV1" at 1.219,9.703 h1.8
  text "GND" at 9.042,9.601 h1.8
  text "+5V" at 32.944,4.343 h1.8
  text "3.3V" at 56.464,4.14 h1.8
  text "S2" at 98.196,4.089 h1.5
Bottom Overlay:
  lines w0.1: 81.94,29.845 82.144,29.845 83.693,28.296 ; 91.948,29.947 92.38,29.947 94.031,28.296 ; 106.655,48.87 108.534,48.87 ; 107.848,48.87 107.848,48.082 109.982,45.949
Mechanical 1:
  circle w0.1: c23.5,62 r1.65
  circle w0.1: c23.5,87 r1.65
  circle w0.1: c60,103.295 r1.35
  circle w0.1: c96.5,62 r1.65
  circle w0.1: c96.5,87 r1.65
  circle w0.1: c23.5,61.988 r1.65
  circle w0.1: c23.5,87.007 r1.65
  circle w0.1: c60,103.289 r1.35
  circle w0.1: c96.5,61.988 r1.65
  circle w0.1: c96.5,87.007 r1.65
  lines w0.1: -8,53.395 -8,107.195 ; -8,77.147 -8,50.4 -1,50.4 -1,36.4 -8,36.4 -8,8 ; -8,81.947 -8,110.2 -1,110.2 -1,124.2 -8,124.2 -8,125.5 ; 128,53.395 128,107.195 ; 128,77.147 128,50.4 121,50.4 121,36.4 128,36.4 128,8 ; 128,81.947 128,110.2 121,110.2 121,124.2 128,124.2 128,125.5 ; -8,8 0,0 ; -8,8 0,0 ; -8,125.5 0,133.5 ; -8,125.5 0,133.5 ; 0,0 15.773,0 15.773,7 29.773,7 29.773,0 120,0 ; 0,133.5 120,133.5 ; 0,133.5 120,133.5 ; 35,49.495 35,99.495 ; 35,49.495 49,49.495 ; 35,49.495 35,99.495 ; 35,49.495 49,49.495 ; 35,99.495 85,99.495 ; 35,99.495 85,99.495 ; 49,22.895 71,22.895 ; 49,22.895 49,49.495 ; 49,22.895 71,22.895 ; 49,22.895 49,49.495 ; 71,22.895 71,49.495 ; 71,22.895 71,49.495 ; 71,49.495 85,49.495 ; 71,49.495 85,49.495 ; 85,49.495 85,99.495 ; 85,49.495 85,99.495 ; 120,0 128,8 ; 120,0 128,8 ; 120,133.5 128,125.5 ; 120,133.5 128,125.5
Mechanical 15:
  lines w0.1: 60,-13.828 60,123.418

## Text inside footprints (layer, text, board x,y; h text height)
P3: Bottom Overlay "A" at -1.812,107.075 h2.03 r90; Bottom Overlay "B" at 0.738,107.074 h2.03 r90
P4: Bottom Overlay "B" at 119.259,52.038 h2.03 r270; Bottom Overlay "A" at 121.809,52.037 h2.03 r270
P10: Top Overlay "12" at 118.511,4.532 h1.6; Top Overlay "11" at 118.511,1.992 h1.6; Top Overlay "1" at 101.62,1.992 h1.6; Top Overlay "2" at 101.62,4.532 h1.6
P21: Top Overlay "12" at 70.649,2.968 h1.6 r180; Top Overlay "11" at 70.649,5.508 h1.6 r180; Top Overlay "1" at 87.54,5.508 h1.6 r180; Top Overlay "2" at 87.54,2.968 h1.6 r180
P30: Top Overlay "2" at 116.54,122.968 h1.6 r180; Top Overlay "1" at 116.54,125.508 h1.6 r180; Top Overlay "16" at 94.188,122.714 h1.02 r180; Top Overlay "15" at 94.188,125.762 h1.02 r180; Top Overlay "19" at 89.489,125.508 h1.6 r180; Top Overlay "20" at 89.362,122.968 h1.6 r180
U11: Top Overlay "HV7" at 19.719,88.842 h0.76; Top Overlay "HV6" at 17.814,88.842 h0.76; Top Overlay "HV5" at 19.719,90.112 h0.76; Top Overlay "HV4" at 17.814,90.112 h0.76; Top Overlay "HV3" at 19.719,91.382 h0.76; Top Overlay "HV2" at 17.814,91.382 h0.76; Top Overlay "HEAT1" at 19.211,93.916 h0.76; Top Overlay "GND" at 17.92,93.922 h0.76; Top Overlay "HEAT2" at 17.814,92.646 h0.76; Top Overlay "HV1" at 19.973,92.652 h0.76; Top Overlay "HV9" at 19.719,87.572 h0.76; Top Overlay "HV11" at 19.719,86.302 h0.76; Top Overlay "HV13" at 19.719,85.032 h0.76; Top Overlay "HV15" at 19.719,83.762 h0.76; Top Overlay "HV17" at 19.719,82.492 h0.76; Top Overlay "HV19" at 19.719,81.222 h0.76; Top Overlay "HV21" at 19.719,79.952 h0.76; Top Overlay "HV23" at 19.719,78.682 h0.76; Top Overlay "HV25" at 19.719,77.412 h0.76; Top Overlay "HV27" at 19.719,76.142 h0.76; Top Overlay "HV29" at 19.719,74.872 h0.76; Top Overlay "HV31" at 19.719,73.602 h0.76; Top Overlay "HV33" at 19.719,72.332 h0.76; Top Overlay "HV35" at 19.719,71.062 h0.76; Top Overlay "HV37" at 19.719,69.792 h0.76; Top Overlay "HV39" at 19.719,68.522 h0.76; Top Overlay "HV41" at 19.719,67.252 h0.76; Top Overlay "HV43" at 19.719,65.982 h0.76; Top Overlay "HV45" at 19.719,64.712 h0.76; Top Overlay "HV47" at 19.719,63.442 h0.76; Top Overlay "HV49" at 19.719,62.172 h0.76; Top Overlay "HV51" at 19.719,60.902 h0.76; Top Overlay "HV53" at 19.719,59.632 h0.76; Top Overlay "HV55" at 19.719,58.362 h0.76; Top Overlay "HV57" at 19.719,57.092 h0.76; Top Overlay "HV59" at 19.719,55.822 h0.76; Top Overlay "HV8" at 17.814,87.572 h0.76; Top Overlay "HV10" at 17.814,86.302 h0.76; Top Overlay "HV12" at 17.814,85.032 h0.76; Top Overlay "HV14" at 17.814,83.762 h0.76; Top Overlay "HV16" at 17.814,82.492 h0.76; Top Overlay "HV18" at 17.814,81.222 h0.76; Top Overlay "HV20" at 17.814,79.952 h0.76; Top Overlay "HV22" at 17.814,78.682 h0.76; Top Overlay "HV24" at 17.814,77.412 h0.76; Top Overlay "HV26" at 17.814,76.142 h0.76; Top Overlay "HV28" at 17.814,74.872 h0.76; Top Overlay "HV30" at 17.814,73.602 h0.76; Top Overlay "HV32" at 17.814,72.332 h0.76; Top Overlay "HV34" at 17.814,71.062 h0.76; Top Overlay "HV36" at 17.814,69.792 h0.76; Top Overlay "HV38" at 17.814,68.522 h0.76; Top Overlay "HV40" at 17.814,67.252 h0.76; Top Overlay "HV42" at 17.814,65.982 h0.76; Top Overlay "HV44" at 17.814,64.712 h0.76; Top Overlay "HV46" at 17.814,63.442 h0.76; Top Overlay "HV48" at 17.814,62.172 h0.76; Top Overlay "HV50" at 17.814,60.902 h0.76; Top Overlay "HV52" at 17.814,59.632 h0.76; Top Overlay "HV54" at 17.814,58.362 h0.76; Top Overlay "HV56" at 17.814,57.092 h0.76; Top Overlay "HV58" at 17.814,55.822 h0.76; Top Overlay "HV60" at 17.814,54.552 h0.76; Top Overlay "GND" at 19.698,54.552 h0.76; Top Overlay "HV54" at 98.967,88.842 h0.76; Top Overlay "HV55" at 100.999,88.842 h0.76; Top Overlay "HV56" at 98.967,90.112 h0.76; Top Overlay "HV57" at 100.999,90.112 h0.76; Top Overlay "HV58" at 98.967,91.382 h0.76; Top Overlay "HV59" at 100.999,91.382 h0.76; Top Overlay "GND" at 101.252,93.804 h0.76; Top Overlay "HEAT3" at 98.966,93.804 h0.76; Top Overlay "HV60" at 98.839,92.534 h0.76; Top Overlay "HEAT4" at 100.617,92.534 h0.76; Top Overlay "HV52" at 98.967,87.572 h0.76; Top Overlay "HV50" at 98.967,86.302 h0.76; Top Overlay "HV48" at 98.967,85.032 h0.76; Top Overlay "HV46" at 98.967,83.762 h0.76; Top Overlay "HV44" at 98.967,82.492 h0.76; Top Overlay "HV42" at 98.967,81.222 h0.76; Top Overlay "HV40" at 98.967,79.952 h0.76; Top Overlay "HV38" at 98.967,78.682 h0.76; Top Overlay "HV36" at 98.967,77.412 h0.76; Top Overlay "HV34" at 98.967,76.142 h0.76; Top Overlay "HV32" at 98.967,74.872 h0.76; Top Overlay "HV30" at 98.967,73.602 h0.76; Top Overlay "HV28" at 98.967,72.332 h0.76; Top Overlay "HV26" at 98.967,71.062 h0.76; Top Overlay "HV24" at 98.967,69.792 h0.76; Top Overlay "HV22" at 98.967,68.522 h0.76; Top Overlay "HV20" at 98.967,67.252 h0.76; Top Overlay "HV18" at 98.967,65.982 h0.76; Top Overlay "HV16" at 98.967,64.712 h0.76; Top Overlay "HV14" at 98.967,63.442 h0.76; Top Overlay "HV12" at 98.967,62.172 h0.76; Top Overlay "HV10" at 98.967,60.902 h0.76; Top Overlay "HV08" at 98.967,59.632 h0.76; Top Overlay "HV06" at 98.967,58.362 h0.76; Top Overlay "HV04" at 98.967,57.092 h0.76; Top Overlay "HV02" at 98.967,55.822 h0.76; Top Overlay "HV53" at 100.999,87.572 h0.76; Top Overlay "HV51" at 100.999,86.302 h0.76; Top Overlay "HV49" at 100.999,85.032 h0.76; Top Overlay "HV47" at 100.999,83.762 h0.76; Top Overlay "HV45" at 100.999,82.492 h0.76; Top Overlay "HV43" at 100.999,81.222 h0.76; Top Overlay "HV41" at 100.999,79.952 h0.76; Top Overlay "HV39" at 100.999,78.682 h0.76; Top Overlay "HV37" at 100.999,77.412 h0.76; Top Overlay "HV35" at 100.999,76.142 h0.76; Top Overlay "HV33" at 100.999,74.872 h0.76; Top Overlay "HV31" at 100.999,73.602 h0.76; Top Overlay "HV29" at 100.999,72.332 h0.76; Top Overlay "HV27" at 100.999,71.062 h0.76; Top Overlay "HV25" at 100.999,69.792 h0.76; Top Overlay "HV23" at 100.999,68.522 h0.76; Top Overlay "HV21" at 100.999,67.252 h0.76; Top Overlay "HV19" at 100.999,65.982 h0.76; Top Overlay "HV17" at 100.999,64.712 h0.76; Top Overlay "HV15" at 100.999,63.442 h0.76; Top Overlay "HV13" at 100.999,62.172 h0.76; Top Overlay "HV11" at 100.999,60.902 h0.76; Top Overlay "HV09" at 100.999,59.632 h0.76; Top Overlay "HV07" at 100.999,58.362 h0.76; Top Overlay "HV05" at 100.999,57.092 h0.76; Top Overlay "HV03" at 100.999,55.822 h0.76; Top Overlay "HV01" at 100.999,54.552 h0.76; Top Overlay "GND" at 98.946,54.552 h0.76; Top Overlay "NTC2-" at 63.008,109.96 h0.76; Top Overlay "NTC2+" at 65.548,109.96 h0.76; Top Overlay "NTC1+" at 52.721,109.96 h0.76; Top Overlay "NTC1-" at 55.301,110.01 h0.76